# Altium PCB PCI Express Mini_3000X5095_52PIN_Full-Mini-Type F1.PCBDOC (part 6 of 8)
Units mm, origin at the board's own origin, x right, y up, seen from the top; angles counter-clockwise.
Board outline 70 x 83.2 mm, 6 copper layers (TopLayer, Layer 1, Layer 2, Layer 3, Layer 4, Bottom Layer), stack 0.914 mm thick; 380 components, 252 nets, 1258 pads, 603 vias.
Unrouted connection lines stored in the file: 10.
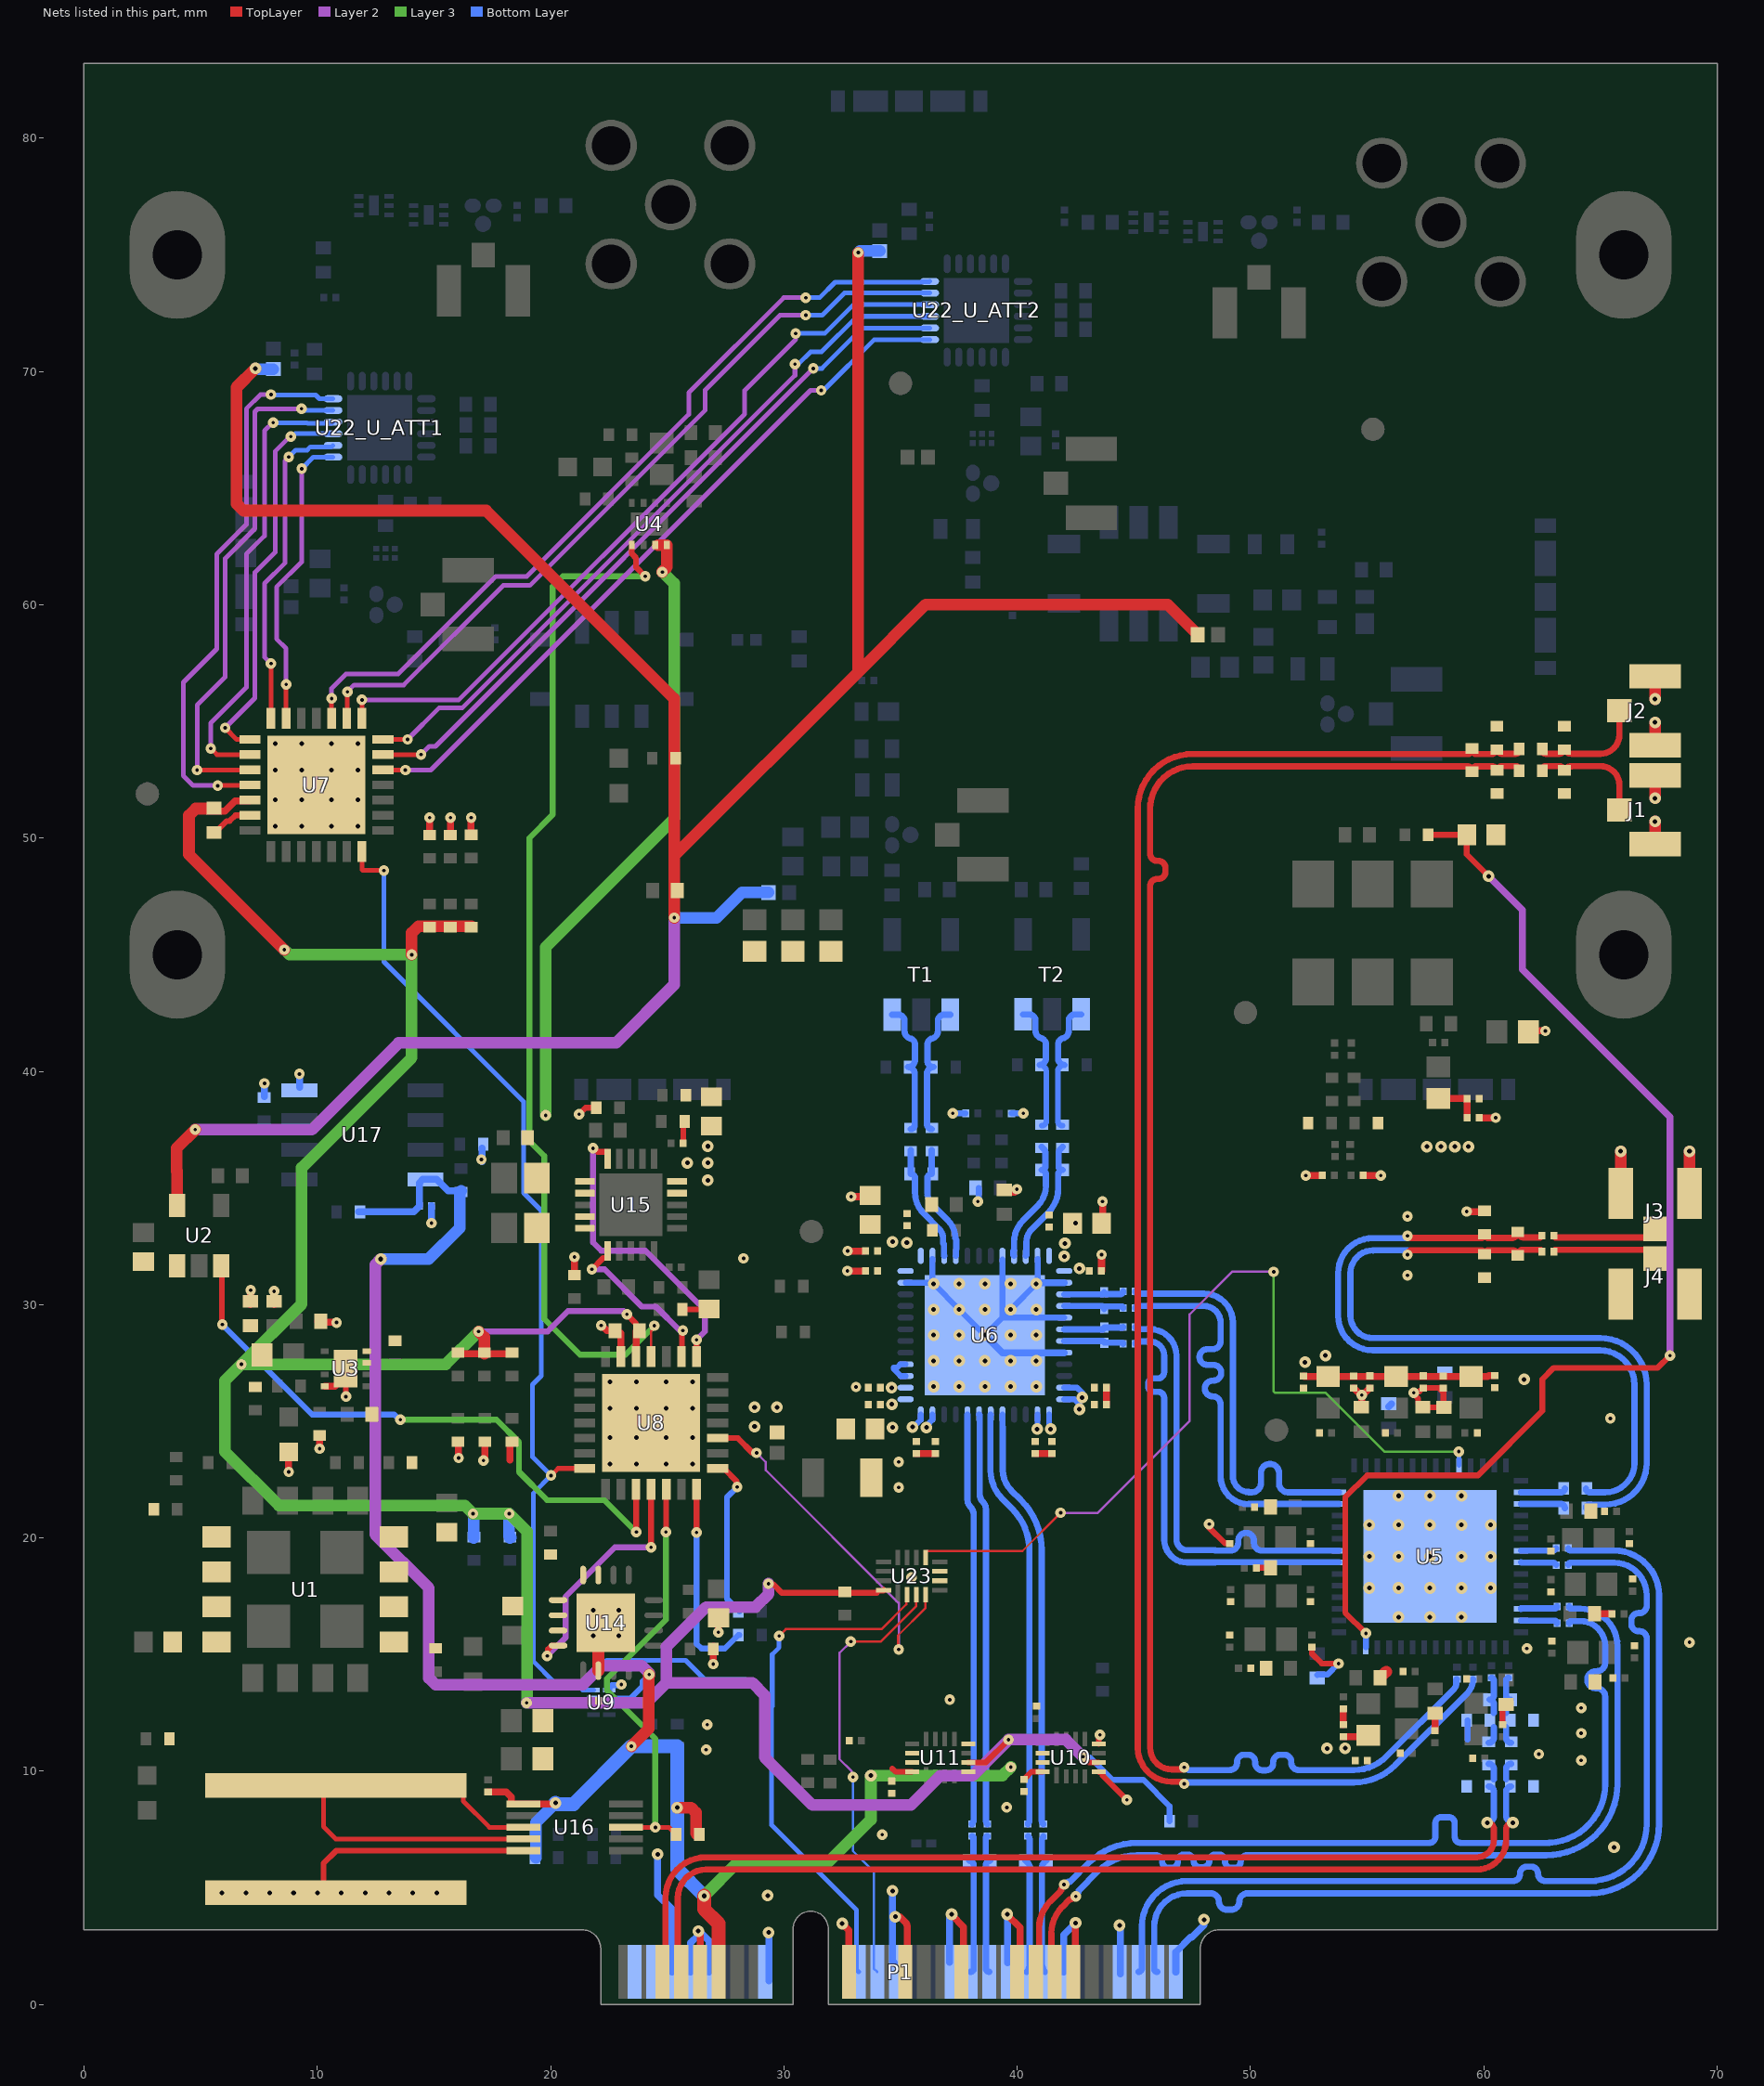
[diagram p7: the nets of this part, all layers, seen from the top]

## Via types
v1: diameter 0.45, hole 0.15, TopLayer to Bottom Layer, tented both sides, 332 vias
v2: diameter 0.5, hole 0.2, TopLayer to Bottom Layer, tented both sides, 214 vias
v3: diameter 0.5, hole 0.2, TopLayer to Bottom Layer, 32 vias
v4: diameter 0.45, hole 0.15, TopLayer to Bottom Layer, 25 vias

## Nets (pads, with @x,y where several pads share a name; then routed paths per layer and width w, separated by ;. In a path a pad name is that pad's centre, name@x,y a point inside that pad or via, vN(x,y) a via of type N, cw(c..) or ccw(c..) an arc to the next point about the centre after c; other vN are vias at no path point) (continued)
3V3_DIGIT: C9.2 C67.2 C68.2 FB1.2 R10.1 R11.1 R57.1 R58.1 R59.1 R64.1 R67.1 R68.1 R69.1 R75.1 R124.2 U7.5 U8.5 U9.7 U10.6 U11.6 U23.16 | length 140.9
  TopLayer w0.25: v1(23.269,29.581) 23.66,29.19 23.66,28.891 C67.2@23.675,28.876 ; v1(29.343,18.038) 29.381,18 29.552,18 29.906,17.646 32.61,17.646 33.983,17.646 34.077,17.739 34.252,17.739 U23.16@34.277,17.764 ; U11.6@37.9,10.379 38.663,10.379 39.631,11.347 v4(39.631,11.351) ; v1(42.826,10.62) 42.826,10.618 43.064,10.379 U10.6@43.495,10.379
  TopLayer w0.3: C68.2@5.576,51.154 6.036,51.154 6.477,51.595 7.084,51.595 U7.5@7.117,51.627 ; R69.1@16.032,27.892 17.162,27.892 R67.1@18.351,27.892 ; U8.5@23.66,27.779 23.668,27.787 23.668,28.868 C67.2@23.675,28.876
  TopLayer w0.5: C68.2@5.576,51.264 4.791,51.264 4.498,50.971 4.498,49.301 v1(8.587,45.212) ; v1(14.046,45) 14.046,45.934 14.339,46.227 R59.1@16.596,46.227 ; v1(16.916,28.848) 17.162,28.603 R68.1@17.162,27.892
  Layer 2 w0.25: v1(16.916,28.848) 19.877,28.848 20.747,29.719 23.131,29.719 v1(23.269,29.581)
  Layer 2 w0.5: v1(18.976,12.931) 24.105,12.931 24.959,13.785 ; v1(29.343,18.038) 29.343,17.603 28.779,17.039 26.667,17.039 24.959,15.331 24.959,13.785 ; v1(42.826,10.62) 42.092,11.354 39.631,11.354 38.083,9.806 36.698,9.806 35.439,8.547 31.229,8.547 29.179,10.597 29.179,13.258 28.649,13.788 28.646,13.785 24.959,13.785
  Layer 3 w0.5: v1(8.587,45.212) 8.596,45.212 8.808,45 v1(14.046,45) 14.046,40.586 9.332,35.871 9.332,30.023 v1(6.751,27.442) ; v1(16.916,28.848) 15.51,27.442 v1(6.751,27.442) ; v1(18.976,12.931) 18.987,12.941 18.987,20.28 v1(18.227,21.04) v1(16.674,21.04) 16.322,21.392 8.352,21.392 6.05,23.693 6.05,26.741 v1(6.751,27.442)
  Bottom Layer w0.25: v1(42.826,10.62) 42.864,10.582 43.123,10.582 44.08,9.624 45.41,9.624 46.532,8.502 R64.1@46.532,7.858
  Bottom Layer w0.5: v1(16.674,21.04) 16.711,21.003 R10.1@16.711,19.989 ; v1(18.227,21.04) 18.227,20.081 18.288,20.019 R11.1@18.257,19.989
3V3_MB: C14.1 C70.1 C153.2 C154.2 P1.11 R65.2 R66.2 R107.2 R110.1 R111.1 R112.2 R113.2 U9.2 U10.14 U10.15 U10.16 U11.14 U11.15 U11.16 U16.6 U17.8 | length 89
  TopLayer w0.25: 34.639,10.118 34.778,9.979 U11.16@35.5,9.979 ; C70.1@40.287,9.65 40.297,9.65 40.322,9.675 40.322,9.68 40.62,9.979 U10.16@41.095,9.979
  TopLayer w0.3: C153.2@17.323,9.107 18.102,9.107 18.316,8.893 18.316,8.594 U16.6@18.827,8.594 20.111,8.594 20.155,8.638 v2(20.209,8.638)
  TopLayer w0.5: v4(23.465,11.069) 24.204,11.809 24.204,14.069 24.224,14.09 v1(24.224,14.148) ; v2(25.429,8.437) 26.024,8.437 26.229,8.232 26.229,7.335 26.279,7.285 R107.2@26.329,7.285
  TopLayer w0.6: v2(26.579,4.655) 26.579,4.093 27.2,3.472 P1.11@27.2,1.4
  Layer 2 w0.5: v2(12.725,31.953) 12.48,31.708 12.48,20.153 14.783,17.85 14.783,13.993 15.076,13.7 21.376,13.7 22.195,14.52 23.91,14.52 24.224,14.206 v1(24.224,14.148)
  Layer 3 w0.5: v2(26.579,4.655) 27.995,6.071 31.873,6.071 33.727,7.924 v2(33.727,9.811) 39.36,9.811 v4(39.727,10.178)
  Bottom Layer w0.2: U9.2@22.514,13.131 23.428,13.131
  Bottom Layer w0.25: 23.428,13.131 23.952,13.656 23.952,13.855 24.224,14.127 v1(24.224,14.148)
  Bottom Layer w0.3: R113.2@11.777,33.977 R113.2@11.827,33.977 14.133,33.977 14.377,34.221 C154.2@14.377,34.231 14.377,35.224 14.527,35.374 U17.8@14.637,35.374 15.112,35.374 15.605,34.88 R112.2@16.161,34.88
  Bottom Layer w0.5: v2(12.725,31.953) 14.774,31.953 16.111,33.29 16.111,34.83 R112.2@16.161,34.88 ; R111.1@19.38,6.294 19.378,6.297 19.378,7.282 19.375,7.285 19.375,7.805 v2(20.209,8.638)
  Bottom Layer w0.6: v2(20.209,8.638) 20.255,8.592 20.988,8.592 v4(23.465,11.069) 25.429,11.069 R66.2@25.429,11.019 v2(25.429,8.437) 25.429,5.805 v2(26.579,4.655)
3V6_DCDC: C2.2 C6.2 C10.2 C91.2 C139.2 C140.2 R2.2 R97.2 R120.2 R123.1 U1.9 U1.10 U1.11 U1.12 U3.7 U3.8 U4.7 U4.8 U14.1 U14.2 U14.3 U14.15 U14.16 U15.1 U15.2 U15.4 U15.5 | length 27.4
  TopLayer w0.5: 24.609,62.563 U4.8@24.984,62.563 24.984,61.619 24.789,61.424 v1(24.789,61.399)
  Layer 3 w0.5: v1(19.787,38.116) 19.787,45.322 25.298,50.833 25.298,60.915 24.814,61.399 v1(24.789,61.399)
5V: C4.2 FB24.1 FB25.1 FB26.1 FB27.1 R122.2 U2.5 | length 119
  TopLayer w0.5: 3.976,35.712 3.971,35.712 3.971,36.703 v1(4.768,37.5) ; U2.5@3.988,34.258 3.988,35.724 ; v2(7.348,70.13) 6.539,69.32 6.539,64.331 6.831,64.038 17.242,64.038 25.298,55.982 25.298,53.422 25.298,49.224 ; v1(25.298,46.585) 25.298,47.761 25.298,49.224 ; v1(33.187,75.098) 33.187,57.114 ; FB27.1@47.735,58.715 46.442,60.009 36.082,60.009 33.187,57.114 ; 25.298,49.224 33.187,57.114
  Layer 2 w0.5: v1(4.768,37.5) 9.764,37.5 13.487,41.224 22.809,41.224 25.298,43.713 v1(25.298,46.585)
  Bottom Layer w0.5: v2(7.348,70.13) 7.378,70.1 FB24.1@8.118,70.1 ; v1(25.298,46.585) 27.12,46.585 28.199,47.665 FB26.1@29.341,47.665 ; v1(33.187,75.098) 33.254,75.164 FB25.1@34.108,75.164
12V: C1.2 C3.2 R1.2 R106.2 R121.2 U1.1 U1.2 U1.3 U1.4 U2.1 U16.8 U16.9 | length 19.7
  TopLayer w0.2: U16.9@18.827,7.094 10.793,7.094 10.267,7.62 10.267,8.965 10.692,9.39 15.837,9.39 16.262,8.965 16.262,8.714 17.382,7.594 U16.8@18.827,7.594
2122_0VDD: C88.2 C89.2 C90.2 C179.2 FB7.2 U6.25 U6.26 U6.35 U6.36 | length 2.7
  Bottom Layer w0.25: v2(35.509,24.753) 35.553,24.753 35.867,25.067 U6.36@35.867,25.292 ; v2(36.109,24.732) 36.157,24.78 36.157,24.857 36.367,25.067 U6.35@36.367,25.292 ; v2(40.855,24.668) 40.867,24.681 U6.26@40.867,25.292 ; U6.25@41.367,25.292 41.367,24.799 41.431,24.736 v2(41.431,24.668)
  other v4: 34.924,22.166 34.924,23.254
2122_VCC: C76.2 C77.2 C78.2 C79.2 C80.2 C81.2 C82.2 C83.2 C84.2 C85.2 C86.2 C87.2 FB6.2 R96.1 U6.1 U6.12 U6.13 U6.23 U6.24 U6.37 U6.38 U6.48 | length 2
  Bottom Layer w0.25: U6.24@42.017,25.942 42.452,25.942 42.669,25.725 v2(42.669,25.516) ; U6.23@42.017,26.442 42.561,26.442 42.786,26.218 v2(42.786,26.018)
  other v2: 34.658,24.731 28.744,24.772 28.744,25.603 29.701,25.602 34.631,25.734 34.615,26.438 42.669,31.552 42.02,32.072 42.044,32.622 35.27,32.652 34.661,32.692 42.507,33.486
4610_FINE_V: C93.2 C94.2 C97.2 C98.2 C101.2 C102.2 C105.2 C106.2 C109.2 C110.2 C129.2 C130.2 FB8.1 FB9.1 FB10.1 FB11.1 FB12.1 R100.2 R104.2 R105.2 U15.14 U15.15 | length 14
  TopLayer w0.25: v1(21.223,38.16) 21.505,38.442 R104.2@22.01,38.442 ; C130.2@25.68,36.925 25.688,36.934 25.688,37.847 R100.2@25.696,37.855
  TopLayer w0.3: R105.2@21.023,31.214 v1(21.023,32.041) ; C105.2@52.273,26.941 52.283,26.941 52.311,26.913 FB11.1@53.322,26.913 FB10.1@56.239,26.913 FB8.1@59.454,26.913 60.164,26.913 60.218,26.967 C93.2@60.462,26.967 ; C98.2@53.978,11.474 54.979,11.474 FB9.1@55.049,11.544 ; FB12.1@58.054,38.836 C110.2@59.278,38.836 C109.2@59.278,38.01
  other v2: 53.282,10.975 54.057,10.988 61.73,26.792 52.34,27.53 53.213,27.817 26.741,35.328 25.86,36.08 26.741,36.08 26.741,36.788 57.558,36.77 58.164,36.77 58.758,36.77 59.344,36.77
04610_Stat1: U5.10 U23.9 | length 37.5
  TopLayer w0.1: U23.9@36.077,19.164 36.077,19.389 36.127,19.439 40.224,19.439 v1(41.861,21.076)
  Layer 2 w0.1: v1(41.861,21.076) 43.45,21.076 47.396,25.023 47.396,29.585 49.235,31.424 50.973,31.424 v1(50.994,31.402)
  Layer 3 w0.1: v1(50.994,31.402) 50.994,26.277 51.052,26.219 53.223,26.219 55.74,23.702 v1(58.928,23.702)
  Bottom Layer w0.2: v1(58.928,23.702) 58.935,23.694 58.935,23.114 U5.10@58.943,23.106
04610_Stat1_3V3: U8.24 U23.4 | length 15.7
  TopLayer w0.1: v1(34.922,15.222) 34.892,15.252 34.892,15.816 36.06,16.984 36.06,17.548 U23.4@36.077,17.564
  TopLayer w0.25: U8.24@27.16,24.279 28.023,24.279 28.656,23.647 v1(28.829,23.647)
  Layer 2 w0.1: v1(28.829,23.647) 29.22,23.256 29.22,22.909 34.922,17.207 v1(34.922,15.222)
+12: P1.2 P1.4 R106.1 U16.10 | length 10.3
  TopLayer w0.25: R106.1@10.789,4.79 10.692,4.79 10.267,5.215 10.267,6.053 10.808,6.594 U16.10@18.827,6.594
  other v2: 5.921,4.776 6.942,4.776 7.964,4.776 8.986,4.776 10.008,4.776 11.029,4.776 12.051,4.776 13.073,4.776 14.095,4.776 15.117,4.776
Ain_2122_A_N: R47.1 R49.2 U6.4 | length 5.1
  Bottom Layer w0.268: R49.2@36.342,36.627 36.337,36.627 36.337,35.604 ccw(c36.337,35.418) 36.151,35.418 36.151,34.802 ccw(c36.891,34.802) 36.367,34.278 37.034,33.612 cw(c36.278,32.857) 37.347,32.857 37.347,32.854 cw(c37.251,32.758) 37.386,32.758 37.386,32.377 ccw(c37.41,32.353) 37.376,32.353 37.376,32.101 U6.4@37.367,32.092
AIn_2122_A_P: R45.2 R47.2 U6.3 | length 5.1
  Bottom Layer w0.268: R45.2@35.43,36.627 35.437,36.627 35.437,35.604 cw(c35.437,35.418) 35.623,35.418 35.623,34.8 ccw(c36.887,34.8) 35.993,33.906 36.658,33.241 cw(c36.271,32.854) 36.819,32.854 36.819,32.663 ccw(c36.886,32.663) 36.838,32.615 cw(c36.791,32.567) 36.858,32.567 36.858,32.101 U6.3@36.867,32.092
AIn_2122_B_N: R53.1 R56.2 U6.9 | length 5.4
  Bottom Layer w0.268: U6.9@39.867,32.092 39.839,32.12 39.839,32.291 cw(c39.887,32.291) 39.853,32.325 ccw(c39.819,32.359) 39.867,32.359 39.867,32.682 cw(c41.182,32.682) 40.252,33.612 40.875,34.235 ccw(c40.011,35.099) 41.233,35.099 41.233,35.585 ccw(c41.047,35.585) 41.047,35.771 ccw(c41.047,35.937) 41.213,35.937 41.213,36.507 ccw(c40.988,36.507) R56.2@41.147,36.666 ; R56.2@41.047,36.766 R56.2@41.147,36.666
AIn_2122_B_P: R51.2 R53.2 U6.10 | length 5.4
  Bottom Layer w0.268: U6.10@40.367,32.092 40.395,32.12 40.395,32.678 cw(c41.191,32.678) 40.628,33.241 41.326,33.939 ccw(c40.275,34.989) 41.761,34.989 41.761,35.585 cw(c41.947,35.585) 41.947,35.771 cw(c41.947,35.947) 41.771,35.947 41.771,36.403 ccw(c41.747,36.427) 41.781,36.427 41.781,36.507 cw(c42.007,36.507) 41.847,36.666 R51.2@41.947,36.766
Ain_2122A_N: R48.1 R49.1 T1.3 | length 5.9
  Bottom Layer w0.268: R48.1@36.151,40.453 ccw(c36.417,40.453) 36.417,40.186 ccw(c36.417,39.902) 36.134,39.902 36.134,37.736 ccw(c36.342,37.736) R49.1@36.342,37.527 ; 36.151,40.487 36.151,41.147 cw(c36.419,41.147) 36.351,41.406 ccw(c36.267,41.729) 36.601,41.729 36.601,42.161 cw(c36.869,42.161) 36.869,42.429 T1.3@37.137,42.429
AIn_2122A_P: R45.1 R46.2 T1.1 | length 6
  Bottom Layer w0.268: T1.1@34.637,42.429 34.905,42.429 cw(c34.905,42.161) 35.173,42.161 35.173,41.729 ccw(c35.507,41.729) 35.423,41.406 cw(c35.355,41.147) 35.623,41.147 35.623,40.487 cw(c35.322,40.487) 35.322,40.186 cw(c35.322,39.902) 35.606,39.902 35.606,37.702 cw(c35.43,37.702) R45.1@35.43,37.527
AIn_2122B_N: R55.1 R56.1 T2.1 | length 5.8
  Bottom Layer w0.234: R55.1@40.956,40.275 cw(c40.956,39.975) 41.255,39.975 41.255,37.874 cw(c41.047,37.874) R56.1@41.047,37.666
  Bottom Layer w0.267: T2.1@40.248,42.443 40.518,42.443 cw(c40.518,42.176) 40.785,42.176 40.785,41.743 ccw(c41.118,41.743) 41.032,41.421 cw(c40.962,41.163) 41.229,41.163 41.229,40.548 cw(c40.956,40.548) R55.1@40.956,40.275
AIn_2122B_P: R51.1 R52.2 T2.3 | length 5.9
  Bottom Layer w0.234: R51.1@41.947,37.666 cw(c41.947,37.874) 41.739,37.874 41.739,39.984 cw(c42.03,39.984) R52.2@42.03,40.275
  Bottom Layer w0.267: R52.2@42.03,40.275 cw(c42.03,40.548) 41.756,40.548 41.756,40.925 41.756,41.16 cw(c42.023,41.16) 41.959,41.419 ccw(c41.878,41.743) 42.212,41.743 42.212,42.176 cw(c42.479,42.176) 42.479,42.443 T2.3@42.748,42.443
Alert_curr_vol_meas: R107.1 U8.19 U16.3 | length 18.7
  TopLayer w0.2: U16.3@23.227,7.594 v1(24.491,7.594) 25.069,7.594 R107.1@25.379,7.285 R107.1@25.429,7.285
  TopLayer w0.25: v1(24.945,20.249) 24.953,20.257 24.953,22.072 U8.19@24.96,22.079
  Layer 3 w0.25: v1(24.491,7.594) 24.491,11.392 22.419,13.464 22.419,13.969 24.945,16.495 v1(24.945,20.249)
ATT_330_V1: U7.19 U22_U_ATT2.19 | length 31.1
  TopLayer w0.2: U7.19@12.817,52.927 12.831,52.913 v1(13.776,52.913)
  Layer 2 w0.2: v1(13.776,52.913) 14.863,52.913 31.14,69.19 v1(31.598,69.19)
  Bottom Layer w0.2: v1(31.598,69.19) 31.699,69.19 33.873,71.364 U22_U_ATT2.19@36.248,71.364
ATT_330_V2: U7.20 U22_U_ATT2.20 | length 31
  TopLayer w0.2: U7.20@12.817,53.577 v1(14.45,53.577)
  Layer 2 w0.2: v1(14.45,53.577) 14.8,53.927 15.062,53.927 v1(31.264,70.13)
  Bottom Layer w0.2: v1(31.264,70.13) 31.631,70.13 33.365,71.864 U22_U_ATT2.20@36.248,71.864
ATT_330_V3: U7.21 U22_U_ATT2.21 | length 31.2
  TopLayer w0.2: U7.21@12.817,54.227 v1(13.87,54.227)
  Layer 2 w0.2: v1(13.87,54.227) 15.215,55.573 16.213,55.573 30.474,69.835 v1(30.474,70.312)
  Bottom Layer w0.2: v1(30.474,70.312) 30.62,70.312 31.147,70.84 31.612,70.84 33.136,72.364 U22_U_ATT2.21@36.248,72.364
ATT_330_V4: U7.22 U22_U_ATT2.22 | length 32.9
  TopLayer w0.2: U7.22@11.917,55.127 v1(11.917,55.923)
  Layer 2 w0.2: v1(11.917,55.923) 16.068,55.923 28.316,68.171 28.316,69.184 30.504,71.372 v1(30.504,71.626)
  Bottom Layer w0.2: v1(30.504,71.626) 30.507,71.629 31.751,71.629 32.986,72.864 U22_U_ATT2.22@36.248,72.864
ATT_330_V5: U7.23 U22_U_ATT2.23 | length 33.7
  TopLayer w0.2: U7.23@11.267,55.127 11.281,55.142 11.281,56.254 v1(11.295,56.269)
  Layer 2 w0.2: v1(11.295,56.269) 11.295,56.283 11.574,56.562 13.706,56.562 17.97,60.826 19.113,60.826 26.63,68.342 26.63,69.211 29.834,72.415 v1(30.937,72.415)
  Bottom Layer w0.2: v1(30.937,72.415) 31.644,72.415 32.592,73.364 U22_U_ATT2.23@36.248,73.364
ATT_330_V6: U7.24 U22_U_ATT2.24 | length 34.7
  TopLayer w0.2: U7.24@10.617,55.127 v1(10.617,55.983)
  Layer 2 w0.2: v1(10.617,55.983) 10.617,56.417 11.235,57.035 13.466,57.035 17.651,61.221 18.982,61.221 25.923,68.163 25.923,69.09 29.997,73.164 v1(30.937,73.164)
  Bottom Layer w0.2: v1(30.937,73.164) 31.533,73.164 32.198,73.829 35.892,73.829 35.908,73.845 36.229,73.845 U22_U_ATT2.24@36.248,73.864
ATT_ILS_V1: U7.27 U22_U_ATT1.19 | length 12.9
  TopLayer w0.2: U7.27@8.667,55.127 v1(8.667,56.583)
  Layer 2 w0.2: v1(8.667,56.583) 8.667,58.125 8.255,58.537 8.255,60.76 9.333,61.838 v1(9.333,65.831)
  Bottom Layer w0.2: v1(9.333,65.831) 9.833,66.331 U22_U_ATT1.19@10.676,66.331
ATT_ILS_V2: U7.28 U22_U_ATT1.20 | length 13.9
  TopLayer w0.2: U7.28@8.017,55.127 v1(8.017,57.48)
  Layer 2 w0.2: v1(8.017,57.48) 7.739,57.758 7.739,60.91 8.611,61.782 8.611,66.166 v1(8.776,66.331)
  Bottom Layer w0.2: v1(8.776,66.331) 9.069,66.623 9.564,66.623 9.707,66.767 10.611,66.767 U22_U_ATT1.20@10.676,66.831
ATT_ILS_V3: U7.1 U22_U_ATT1.21 | length 16.8
  TopLayer w0.2: v1(6.05,54.722) 6.544,54.227 U7.1@7.117,54.227
  Layer 2 w0.2: v1(6.05,54.722) 7.329,56 7.329,61.384 8.191,62.247 8.191,66.574 8.826,67.208 v1(8.865,67.208)
  Bottom Layer w0.2: v1(8.865,67.208) 8.932,67.208 9.055,67.331 U22_U_ATT1.21@10.676,67.331
ATT_ILS_V4: U7.2 U22_U_ATT1.22 | length 19.5
  TopLayer w0.2: v1(5.434,53.842) 5.699,53.577 U7.2@7.117,53.577
  Layer 2 w0.2: v1(5.434,53.842) 5.434,54.933 6.96,56.459 6.96,62.173 7.739,62.952 7.739,67.458 8.087,67.806 v1(8.112,67.806)
  Bottom Layer w0.2: v1(8.112,67.806) 9.551,67.806 9.585,67.772 10.617,67.772 U22_U_ATT1.22@10.676,67.831
ATT_ILS_V5: U7.3 U22_U_ATT1.23 | length 22.1
  TopLayer w0.2: v1(4.844,52.913) 7.102,52.913 U7.3@7.117,52.927
  Layer 2 w0.2: v1(4.844,52.913) 4.849,52.918 4.849,55.697 6.05,56.898 6.05,61.981 7.329,63.259 7.329,68.275 7.446,68.392 9.311,68.392 v1(9.322,68.402)
  Bottom Layer w0.2: v1(9.322,68.402) 9.393,68.331 U22_U_ATT1.23@10.676,68.331
ATT_ILS_V6: U7.4 U22_U_ATT1.24 | length 23.9
  TopLayer w0.2: v1(5.735,52.242) 5.753,52.26 7.099,52.26 U7.4@7.117,52.277
  Layer 2 w0.2: v1(5.735,52.242) 5.717,52.26 4.669,52.26 4.259,52.67 4.259,56.675 5.69,58.106 5.69,62.173 6.96,63.443 6.96,68.401 7.57,69.011 v1(8.017,69.011)
  Bottom Layer w0.2: v1(8.017,69.011) 8.041,68.987 9.933,68.987 10.088,68.831 U22_U_ATT1.24@10.676,68.831
CLK_SYNC: P1.20 U23.3 | length 18.9
  TopLayer w0.1: v1(32.868,15.554) 34.147,15.554 35.659,17.066 35.659,17.546 U23.3@35.677,17.564
  Layer 2 w0.1: v1(32.868,15.554) 32.386,15.072 32.386,10.522 32.893,10.015 32.893,9.818 v1(32.96,9.751)
  Bottom Layer w0.1: v1(32.96,9.751) 32.96,6.585 33.854,5.691 33.854,1.546 P1.20@34,1.4
CLKin0_N: J1.2 R24.1 R25.2 | length 5.2
  TopLayer w0.267: R24.1@62.459,52.882 cw(c62.664,52.882) 62.664,53.087 63.22,53.087 cw(c63.22,52.855) 63.451,52.855 cw(c63.572,52.855) 63.487,52.94 63.567,53.021 cw(c63.69,52.898) 63.69,53.071 63.762,53.071 cw(c63.792,53.041) 63.792,53.084 64.99,53.084 cw(c64.99,52.259) 65.815,52.259 J1.2@65.815,51.208
CLKin0_P: J2.2 R28.1 R30.1 | length 5.2
  TopLayer w0.267: R30.1@62.459,53.819 ccw(c62.664,53.819) 62.664,53.614 63.228,53.614 ccw(c63.228,53.84) 63.454,53.84 ccw(c63.575,53.84) 63.489,53.755 63.569,53.674 ccw(c63.692,53.797) 63.692,53.624 63.764,53.624 ccw(c63.795,53.654) 63.795,53.611 64.99,53.611 ccw(c64.99,54.436) 65.815,54.436 J2.2@65.815,55.46
CLKin0P_N: C46.2 R24.2 R26.2 R27.2 | length 75.6
  TopLayer w0.267: v1(47.157,10.171) cw(c47.065,10.171) 47.065,10.079 46.622,10.079 cw(c46.622,11.005) 45.696,11.005 45.696,47.029 45.696,47.938 cw(c46.006,47.938) 46.006,48.248 46.045,48.248 ccw(c46.045,48.558) 46.355,48.558 46.355,48.713 ccw(c46.045,48.713) 46.045,49.023 46.006,49.023 cw(c46.006,49.333) 45.696,49.333 45.696,50.258 45.696,51.255 cw(c47.517,51.255) 47.517,53.075 59.303,53.075 cw(c59.303,52.889) 59.49,52.889 cw(c59.676,52.889) 59.676,53.075 60.349,53.075 cw(c60.349,52.855) 60.569,52.855 cw(c60.801,52.855) 60.801,53.087 61.354,53.087 cw(c61.354,52.882) R24.2@61.559,52.882
  Bottom Layer w0.267: v1(47.157,10.171) ccw(c47.379,10.319) 47.379,10.052 48.006,10.052 48.607,10.052 48.98,10.052 ccw(c49.053,11.027) 49.053,10.049 49.114,10.049 ccw(c49.114,10.359) 49.424,10.359 49.424,10.399 cw(c49.734,10.399) 49.734,10.709 49.889,10.709 cw(c49.889,10.399) 50.199,10.399 50.199,10.349 ccw(c50.509,10.349) 50.509,10.039 50.664,10.039 ccw(c50.664,10.349) 50.974,10.349 50.974,10.399 cw(c51.284,10.399) 51.284,10.709 51.439,10.709 cw(c51.439,10.399) 51.749,10.399 51.749,10.359 ccw(c52.059,10.359) 52.059,10.049 53.223,10.049 54.43,10.049 ccw(c54.43,12.021) 55.824,10.627 58.713,13.515 ccw(c58.452,13.776) 58.821,13.776 58.821,13.905 cw(c58.877,13.905) 58.837,13.945 C46.2@58.847,13.945
CLKin0P_P: C47.2 R27.1 R29.1 R30.2 | length 75.8
  TopLayer w0.267: v1(47.157,9.461) ccw(c47.065,9.461) 47.065,9.552 46.622,9.552 cw(c46.622,11.005) 45.169,11.005 45.169,51.255 cw(c47.517,51.255) 47.517,53.602 59.303,53.602 ccw(c59.303,53.789) 59.49,53.789 ccw(c59.676,53.789) 59.676,53.602 60.318,53.602 ccw(c60.318,53.84) 60.556,53.84 ccw(c60.783,53.84) 60.783,53.614 61.354,53.614 ccw(c61.354,53.819) R30.2@61.559,53.819
  Bottom Layer w0.267: v1(47.157,9.461) cw(c47.219,9.461) 47.219,9.522 54.432,9.522 ccw(c54.432,12.017) 56.196,10.253 59.29,13.347 ccw(c58.693,13.945) C47.2@59.538,13.945
CLKin1_N: P1.5 R37.1 R39.1 | length 43.7
  TopLayer w0.267: P1.5@24.8,1.4 ccw(c24.8,1.526) 24.926,1.526 24.926,4.569 cw(c26.668,4.569) 26.668,6.311 59.69,6.311 ccw(c59.69,7.052) 60.431,7.052 60.431,7.511 ccw(c60.145,7.511) v2(60.145,7.798)
  Bottom Layer w0.267: v2(60.145,7.798) ccw(c60.145,8.084) 60.431,8.084 60.431,9.125 ccw(c60.21,9.125) R37.1@60.21,9.347 ; R39.1@60.21,10.316 cw(c60.21,10.096) 60.429,10.096 60.429,9.647
CLKin1_P: P1.7 R31.1 R32.2 | length 43.7
  TopLayer w0.267: P1.7@25.6,1.4 cw(c25.6,1.547) 25.453,1.547 25.453,4.569 cw(c26.668,4.569) 26.668,5.784 59.69,5.784 ccw(c59.69,7.052) 60.958,7.052 60.958,7.511 cw(c61.245,7.511) v2(61.245,7.798)
  Bottom Layer w0.267: 60.956,9.647 60.956,10.096 cw(c61.176,10.096) R31.1@61.176,10.316 ; R32.2@61.18,9.347 ccw(c61.18,9.125) 60.958,9.125 60.958,8.084 ccw(c61.245,8.084) v2(61.245,7.798)
CLKin1P_N: C59.2 R34.1 R38.1 R39.2 | length 2.6
  Bottom Layer w0.267: R39.2@60.21,11.216 ccw(c60.21,11.435) 60.429,11.435 60.429,11.889 ; C59.2@60.323,13.999 cw(c60.323,13.893) 60.429,13.893 60.429,13.253 cw(c60.243,13.253) 60.243,13.066 cw(c60.243,12.88) 60.429,12.88 60.429,12.489
CLKin1P_P: C54.2 R31.2 R33.2 R34.2 | length 2.6
  Bottom Layer w0.267: 60.956,11.889 60.956,11.435 ccw(c61.176,11.435) R31.2@61.176,11.216 ; 60.956,12.489 60.956,12.88 cw(c61.143,12.88) 61.143,13.066 cw(c61.143,13.253) 60.956,13.253 60.956,13.893 cw(c61.063,13.893) C54.2@61.063,13.999
CLKout1_C2_N: C58.1 J4.2 | length 4.6
  TopLayer w0.267: C58.1@63.004,32.272 cw(c63.079,32.272) 63.079,32.348 66.97,32.348 cw(c66.97,31.978) J4.2@67.34,31.978
CLKout1_C2_P: C57.1 J3.2 | length 4.6
  TopLayer w0.267: C57.1@63.007,32.964 ccw(c63.095,32.964) 63.095,32.875 66.97,32.875 ccw(c66.97,33.245) J3.2@67.34,33.245
CLKout1_C_N: C58.2 R36.2 R41.2 R42.2 | length 32.8
  TopLayer w0.267: R42.2@60.003,32.194 cw(c59.921,32.112) 60.037,32.112 cw(c60.093,32.112) R42.2@60.093,32.168
  TopLayer w0.268: v1(56.728,32.144) cw(c56.91,32.144) 56.91,32.326 59.873,32.326 cw(c59.873,32.162) R42.2@60.037,32.162 cw(c60.201,32.162) 60.201,32.326 61.247,32.326 cw(c61.247,32.118) R41.2@61.455,32.118 cw(c61.691,32.118) 61.691,32.354 62.402,32.354 cw(c62.402,32.272) C58.2@62.484,32.272
  Bottom Layer w0.267: 55.255,32.326 v1@56.728,32.326 ; 55.255,32.327 ccw(c55.255,31.354) 54.282,31.354 54.282,29.529 ccw(c55.244,29.529) 55.244,28.567 64.984,28.567 cw(c64.984,26.567) 66.984,26.567 66.984,23.209 cw(c65.204,23.209) 65.204,21.429 64.529,21.429 ccw(c64.529,21.274) R36.2@64.374,21.274
CLKout1_C_P: C57.2 R35.2 R40.2 R41.1 | length 32.7
  TopLayer w0.267: R40.2@60.003,32.986 ccw(c59.921,33.068) R40.2@60.037,33.067
  TopLayer w0.268: v1(56.728,32.945) ccw(c56.818,32.945) 56.818,32.854 59.873,32.854 ccw(c59.873,33.018) R40.2@60.037,33.018 ccw(c60.201,33.018) 60.201,32.854 61.191,32.854 ccw(c61.191,33.118) R41.1@61.455,33.118 ccw(c61.691,33.118) 61.691,32.882 62.405,32.882 ccw(c62.405,32.964) C57.2@62.487,32.964
  Bottom Layer w0.267: v1@56.728,32.854 55.255,32.854 ccw(c55.255,31.354) 53.755,31.354 53.755,29.529 ccw(c55.244,29.529) 55.244,28.04 64.984,28.04 cw(c64.984,26.567) 66.457,26.567 66.457,23.209 cw(c65.204,23.209) 65.204,21.956 64.541,21.956 cw(c64.541,22.124) R35.2@64.374,22.124
CLKout1_N: R36.1 U5.17 | length 2
  Bottom Layer w0.267: U5.17@61.593,21.456 63.291,21.456 cw(c63.291,21.274) R36.1@63.474,21.274
CLKout1_P: R35.1 U5.16 | length 2
  Bottom Layer w0.267: U5.16@61.593,21.956 63.306,21.956 ccw(c63.306,22.124) R35.1@63.474,22.124
CLKout3_C_N: C51.1 P1.48 | length 41.7
  Bottom Layer w0.267: P1.48@45.2,1.4 ccw(c45.2,1.545) 45.345,1.545 45.345,3.353 cw(c47.284,3.353) 47.284,5.292 61.109,5.292 61.242,5.292 ccw(c61.242,5.602) 61.552,5.602 cw(c61.862,5.602) 61.862,5.912 62.017,5.912 cw(c62.017,5.602) 62.327,5.602 ccw(c62.637,5.602) 62.637,5.292 64.541,5.292 ccw(c64.541,7.734) 66.984,7.734 66.984,15.561 66.984,15.695 ccw(c66.674,15.695) 66.674,16.005 66.635,16.005 cw(c66.635,16.315) 66.325,16.315 66.325,16.47 cw(c66.635,16.47) 66.635,16.78 66.674,16.78 ccw(c66.674,17.09) 66.984,17.09 66.984,17.533 ccw(c65.581,17.533) 65.581,18.936 63.72,18.936 ccw(c63.72,18.839) C51.1@63.624,18.839
CLKout3_C_P: C50.1 P1.50 | length 41.8
  Bottom Layer w0.267: P1.50@46,1.4 cw(c46,1.528) 45.872,1.528 45.872,3.353 cw(c47.284,3.353) 47.284,4.765 48.295,4.765 cw(c48.295,4.414) 48.645,4.414 ccw(c48.996,4.414) 48.996,4.064 49.171,4.064 ccw(c49.171,4.414) 49.522,4.414 cw(c49.872,4.414) 49.872,4.765 55.063,4.765 64.541,4.765 ccw(c64.541,7.734) 67.511,7.734 67.511,17.533 ccw(c65.581,17.533) 65.581,19.463 63.72,19.463 cw(c63.72,19.559) C50.1@63.624,19.559
CLKout3_N: C51.2 U5.22 | length 1.6
  Bottom Layer w0.267: U5.22@61.593,18.956 61.613,18.936 62.436,18.936 62.439,18.939 62.95,18.939 cw(c62.95,18.786) 63.059,18.895 63.104,18.849 C51.2@63.104,18.839
CLKout3_P: C50.2 U5.21 | length 1.6
  Bottom Layer w0.267: U5.21@61.593,19.456 62.22,19.456 62.224,19.46 62.95,19.46 ccw(c62.95,19.613) 63.059,19.504 63.104,19.549 C50.2@63.104,19.559
CLKout5_C_N: C192.1 P1.39 | length 40.2
  TopLayer w0.267: P1.39@41.6,1.4 cw(c41.93,1.73) 41.464,1.73 41.464,3.047 cw(c43.084,3.047) 41.938,4.193 42.231,4.486 ; 42.231,4.486 cw(c42.299,4.418) 42.299,4.514 ccw(c42.299,4.611) 42.367,4.542 v1@42.427,4.603 ; v1@42.428,4.603 cw(c42.512,4.518) v1(42.512,4.638)
  Bottom Layer w0.267: v1(42.512,4.638) 42.512,4.687 42.635,4.811 42.635,4.891 43.441,5.696 cw(c45.138,3.998) 45.138,6.399 45.945,6.399 cw(c45.945,6.129) 46.214,6.129 ccw(c46.484,6.129) 46.484,5.86 46.618,5.86 ccw(c46.618,6.129) 46.888,6.129 46.888,6.159 cw(c47.157,6.159) 47.157,6.429 47.292,6.429 cw(c47.292,6.159) 47.561,6.159 ccw(c47.83,6.159) 47.83,5.89 47.965,5.89 ccw(c47.965,6.159) 48.234,6.159 cw(c48.504,6.159) 48.504,6.429 48.638,6.429 cw(c48.638,6.159) 48.908,6.159 48.908,6.129 ccw(c49.177,6.129) 49.177,5.86 49.312,5.86 ccw(c49.312,6.129) 49.581,6.129 cw(c49.851,6.129) 49.851,6.399 52.088,6.399 62.664,6.399 ccw(c62.664,9.466) 65.731,9.466 65.731,15.361 ccw(c64.126,15.361) 64.126,16.966 63.756,16.966 cw(c63.756,17.065) C192.1@63.658,17.065
CLKout5_C_P: C193.1 P1.37 | length 40.1
  TopLayer w0.267: P1.37@40.8,1.4 ccw(c40.47,1.73) 40.937,1.73 40.937,3.156 ; 40.937,3.266 cw(c42.557,3.266) 41.411,4.412 41.858,4.859 ; 41.858,4.859 ccw(c41.79,4.927) 41.887,4.927 cw(c41.983,4.927) 41.915,4.995 41.975,5.055 ccw(c41.89,5.14) v1(42.01,5.14)
  Bottom Layer w0.267: v1(42.01,5.14) 42.059,5.14 42.183,5.263 42.263,5.263 43.069,6.07 cw(c45.136,4.002) 45.136,6.926 57.524,6.926 57.658,6.926 ccw(c57.658,7.193) 57.925,7.193 57.925,7.782 cw(c58.173,7.782) 58.173,8.03 58.503,8.03 cw(c58.503,7.782) 58.751,7.782 58.751,7.193 ccw(c59.018,7.193) 59.018,6.926 62.664,6.926 62.678,6.926 ccw(c62.664,9.466) 62.812,6.93 ccw(c62.664,9.466) 65.204,9.466 65.204,13.066 65.204,13.2 ccw(c64.842,13.2) 64.842,13.562 64.796,13.562 cw(c64.796,13.924) 64.796,14.286 64.842,14.286 ccw(c64.842,14.648) 65.204,14.648 65.204,15.361 ccw(c64.126,15.361) 64.126,16.439 63.756,16.439 ccw(c63.756,16.341) C193.1@63.658,16.341
CLKout5_N: C193.2 U5.27 | length 1.6
  Bottom Layer w0.267: U5.27@61.593,16.456 63.022,16.456 cw(c63.022,16.341) C193.2@63.138,16.341
CLKout5_P: C192.2 U5.26 | length 1.6
  Bottom Layer w0.267: U5.26@61.593,16.956 61.593,16.983 63.056,16.983 ccw(c63.056,17.065) C192.2@63.138,17.065
CLKout8_C_N: C53.1 R43.2 U6.18 | length 2.6
  Bottom Layer w0.268: U6.18@42.017,28.942 43.658,28.942 ccw(c43.658,29.017) R43.2@43.733,29.017 44.518,29.017 ccw(c44.518,29.046) C53.1@44.546,29.046
CLKout8_C_P: C52.1 R43.1 U6.19 | length 2.6
  Bottom Layer w0.268: U6.19@42.017,28.442 43.658,28.442 cw(c43.658,28.367) R43.1@43.733,28.367 44.504,28.367 cw(c44.504,28.326) C52.1@44.546,28.326
CLKout8_N: C53.2 U5.50 | length 18.5
  Bottom Layer w0.268: C53.2@45.066,29.046 ccw(c45.162,29.046) 45.162,28.95 45.694,28.95 cw(c45.694,27.815) 46.828,27.815 46.828,19.932 ccw(c47.286,19.932) 47.286,19.474 48.482,19.474 ccw(c48.5,19.474) 48.5,19.456 49.001,19.456 49.135,19.456 ccw(c49.135,19.793) 49.473,19.793 49.473,19.882 cw(c49.81,19.882) 50.147,19.882 50.147,19.793 ccw(c50.484,19.793) 50.484,19.456 51.948,19.456 U5.50@53.793,19.456
CLKout8_P: C52.2 U5.49 | length 18.5
  Bottom Layer w0.268: C52.2@45.066,28.326 cw(c45.162,28.326) 45.162,28.422 45.694,28.422 cw(c45.694,27.815) 46.3,27.815 46.3,27.108 cw(c46.032,27.108) 46.032,26.84 45.827,26.84 ccw(c45.827,26.64) 45.627,26.64 45.627,26.468 ccw(c45.827,26.468) 45.827,26.268 46.032,26.268 cw(c46.032,26) 46.3,26 46.3,25.365 46.3,19.932 ccw(c47.286,19.932) 47.286,18.946 48.482,18.946 48.482,18.956 U5.49@53.793,18.956
CLKout10_C_N: C56.1 R44.2 U6.16 | length 2.7
  Bottom Layer w0.268: U6.16@42.017,29.942 43.604,29.942 cw(c43.604,29.817) R44.2@43.729,29.817 cw(c43.837,29.817) 43.837,29.926 44.467,29.926 cw(c44.467,29.847) C56.1@44.546,29.847
CLKout10_C_P: C55.1 R44.1 U6.15 | length 2.7
  Bottom Layer w0.268: U6.15@42.017,30.442 43.634,30.442 ccw(c43.634,30.537) R44.1@43.729,30.537 ccw(c43.812,30.537) 43.812,30.454 44.433,30.454 ccw(c44.433,30.567) C55.1@44.546,30.567
CLKout10_N: C56.2 U5.54 | length 18.5
  Bottom Layer w0.268: C56.2@45.066,29.847 cw(c45.162,29.847) 45.162,29.943 48.01,29.943 cw(c48.01,29.237) 48.716,29.237 48.716,28.429 cw(c48.378,28.429) 48.378,28.092 48.151,28.092 ccw(c48.151,27.755) 48.151,27.417 48.408,27.417 cw(c48.408,27.08) 48.408,26.743 48.378,26.743 ccw(c48.378,26.406) 48.378,26.069 cw(c48.378,25.731) 48.716,25.731 48.716,24.381 48.716,22.651 ccw(c49.923,22.651) 49.923,21.443 49.923,21.456 U5.54@53.793,21.456
CLKout10_P: C55.2 U5.55 | length 18.2
  Bottom Layer w0.268: C55.2@45.066,30.567 ccw(c45.162,30.567) 45.162,30.471 48.01,30.471 cw(c48.01,29.237) 49.244,29.237 49.244,22.651 ccw(c49.923,22.651) 49.923,21.971 49.923,21.956 ; 49.924,21.956 50.058,21.956 ccw(c50.058,22.344) 50.446,22.344 50.446,22.786 cw(c50.834,22.786) 51.222,22.786 51.222,22.344 ccw(c51.61,22.344) 51.61,21.956 53.789,21.956 U5.55@53.793,21.956
CMLOUT_A_N: C64.2 P1.32 R82.1 | length 6.1
  Bottom Layer w0.267: C64.2@38.727,7.214 ccw(c38.727,7.141) 38.654,7.141 38.654,6.35 ccw(c38.84,6.35) 38.84,6.163 ccw(c38.84,5.986) 38.664,5.986 38.664,1.536 ccw(c38.8,1.536) P1.32@38.8,1.4
CMLOUT_A_P: C63.2 P1.30 R82.2 | length 6.1
  Bottom Layer w0.267: P1.30@38,1.4 ccw(c38,1.537) 38.137,1.537 38.137,5.967 ccw(c37.94,5.967) 37.94,6.163 ccw(c37.94,6.35) 38.127,6.35 38.127,7.153 ccw(c38.066,7.153) C63.2@38.066,7.214
CMLOUT_AC_N: C64.1 U6.31 | length 17.7
  Bottom Layer w0.269: U6.31@38.367,25.292 38.396,25.263 38.396,21.867 ccw(c38.848,21.867) 38.529,21.547 cw(c38.209,21.227) 38.661,21.227 38.661,7.892 ccw(c38.885,7.892) C64.1@38.727,7.734
CMLOUT_AC_P: C63.1 U6.32 | length 17.6
  Bottom Layer w0.269: U6.32@37.867,25.292 37.867,21.648 ccw(c38.319,21.648) 38,21.328 cw(c37.68,21.008) 38.132,21.008 38.132,7.892 cw(c38.007,7.892) 38.095,7.804 ccw(c38.165,7.734) C63.1@38.066,7.734
CMLOUT_B_N: C61.2 P1.38 R81.1 | length 6
  Bottom Layer w0.267: C61.2@41.12,7.214 cw(c41.018,7.213) 41.09,7.141 ccw(c41.162,7.069) 41.061,7.069 41.061,6.447 ccw(c41.345,6.447) 41.144,6.246 41.213,6.177 ccw(c41.247,6.211) 41.247,6.163 ccw(c41.247,6.115) 41.213,6.149 41.144,6.08 ccw(c41.345,5.879) 41.061,5.879 41.061,4.637 41.063,4.634 41.063,1.73 ccw(c41.53,1.73) P1.38@41.2,1.4
CMLOUT_B_P: C60.2 P1.36 R81.2 | length 6
  Bottom Layer w0.267: P1.36@40.4,1.4 ccw(c40.07,1.73) 40.537,1.73 40.537,4.415 40.534,4.418 40.534,5.879 ccw(c40.249,5.879) 40.45,6.08 40.381,6.149 ccw(c40.347,6.115) 40.347,6.163 ccw(c40.347,6.211) 40.381,6.177 40.45,6.246 ccw(c40.249,6.447) 40.534,6.447 40.534,7.06 ccw(c40.316,7.06) 40.47,7.214 C60.2@40.46,7.214
CMLOUT_BC_N: C61.1 U6.29 | length 18.1
  Bottom Layer w0.269: U6.29@39.367,25.292 39.367,24.763 39.382,24.763 39.382,22.912 ccw(c40.613,22.912) 39.742,22.041 40.155,21.629 cw(c37.99,19.464) 41.051,19.464 41.051,7.901 ccw(c41.287,7.901) C61.1@41.12,7.734
CMLOUT_BC_P: C60.1 U6.30 | length 18.1
  Bottom Layer w0.269: U6.30@38.867,25.292 38.853,25.292 38.853,22.909 ccw(c40.607,22.909) 39.366,21.669 39.778,21.257 cw(c37.982,19.461) 40.522,19.461 40.522,7.879 cw(c40.422,7.879) 40.493,7.808 40.489,7.804 ccw(c40.559,7.734) C60.1@40.46,7.734
CTRL_VCXO: C38.1 R20.1 U5.41 | length 51.7
  TopLayer w0.25: v1(54.947,15.911) 54.06,16.799 54.06,21.746 54.999,22.685 59.752,22.685 62.509,25.443 62.509,26.803 62.996,27.29 67.454,27.29 v1(67.979,27.815) ; R20.1@57.569,50.14 C38.1@59.269,50.14 59.269,49.298 v2(60.202,48.364)
  Layer 2 w0.3: v2(60.202,48.364) 61.646,46.921 61.646,44.374 67.979,38.041 v1(67.979,27.815)
  Bottom Layer w0.25: U5.41@54.943,15.306 54.945,15.309 54.945,15.909 v1(54.947,15.911)
EN_2V8: U4.5 U8.4 | length 45.1
  TopLayer w0.1: U8.4@24.31,27.779 24.31,28.86 24.45,29 v1@24.45,29.041
  TopLayer w0.25: U4.5@23.484,62.563 23.484,62.186 23.661,62.009 23.661,61.615 v1(24.055,61.221) ; v1@24.45,29.041 v1(24.45,29.095)
  Layer 3 w0.25: v1@24.084,61.249 v1(24.055,61.221) 20.53,61.221 20.091,60.782 20.091,51.003 19.093,50.005 19.093,37.011 19.726,36.378 19.726,29.388 21.258,27.856 23.212,27.856 v1(24.45,29.095)
EN_5V: U2.3 U8.17 | length 26.5
  TopLayer w0.25: U2.3@5.888,31.658 5.908,31.638 5.908,29.166 v1(5.928,29.146) ; U8.17@23.66,22.079 23.668,22.072 23.668,20.257 v1(23.675,20.249)
  Layer 3 w0.25: v1@13.564,25.064 v1(13.564,25.067) 17.681,25.067 18.645,24.104 18.645,22.829 19.854,21.62 22.305,21.62 v1(23.675,20.249)
  Bottom Layer w0.25: v1(5.928,29.146) 9.782,25.292 13.298,25.292 13.523,25.067 v1(13.564,25.067)
EN_I2C_TRANSLATOR: P1.18 U7.14 U8.14 U9.8 U23.2 | length 76
  TopLayer w0.1: v1(29.794,15.799) 30.084,16.089 34.18,16.089 35.24,17.149 35.24,17.528 U23.2@35.277,17.564
  TopLayer w0.2: U7.14@11.925,49.392 11.925,48.643 11.942,48.626 12.835,48.626 v1(12.854,48.606) ; v1(20.022,22.676) 20.326,22.979 U8.14@21.46,22.979
  Bottom Layer w0.2: v1(12.854,48.606) 12.854,44.697 18.849,38.702 18.849,34.785 19.603,34.031 19.603,26.95 19.227,26.574 19.227,23.472 v1(20.022,22.676) 19.27,21.923 19.27,14.699 20.133,13.836 21.027,13.836 ; U9.8@21.844,13.481 21.381,13.481 21.027,13.836 ; v1(29.794,15.799) 29.794,15.3 29.5,15.006 29.5,12.781 ; P1.18@33.2,1.4 33.112,1.488 33.112,4.056 29.471,7.697 29.471,12.753 29.5,12.781 ; 21.027,13.836 21.49,13.836 22.41,14.756 25.787,14.756 26.607,13.935 28.346,13.935 29.5,12.781
EN_LMK_1V8: U8.2 U15.6 | length 7.3
  TopLayer w0.25: v1(21.766,31.517) 21.773,31.517 22.26,32.004 22.43,32.004 22.445,32.019 U15.6@22.445,32.304 ; U8.2@25.61,27.779 25.629,27.798 25.629,28.829 25.67,28.87 v1(25.67,28.887)
  Layer 2 w0.25: v1(21.766,31.517) 22.313,31.517 23.914,29.915 24.515,29.915 25.544,28.887 v1(25.67,28.887)
EN_LMK_3V3: U8.1 U15.20 | length 13.1
  TopLayer w0.25: v1(21.823,36.703) 21.864,36.703 22.013,36.554 22.43,36.554 22.445,36.539 U15.20@22.445,36.254 ; U8.1@26.26,27.779 v1@26.26,28.491
  Layer 2 w0.25: v1(21.823,36.703) 21.823,32.662 22.17,32.315 24.069,32.315 26.617,29.768 26.617,28.848 v1@26.26,28.491
  other v1: 26.259,28.491
EN_LMK_SPI: R87.2 U8.22 | length 7
  TopLayer w0.25: U8.22@27.16,22.979 27.425,22.979 27.971,22.433 27.971,22.211 v1(28,22.183)
  Bottom Layer w0.25: v1(28,22.183) 27.559,21.742 27.559,17.393 R87.2@28.1,16.852
EN_LTC_SPI: R13.2 U8.21 | length 8.8
  TopLayer w0.25: v1(26.26,20.233) U8.21@26.26,22.079
  Bottom Layer w0.25: v1(26.26,20.233) 26.26,15.466 26.469,15.257 27.471,15.257 R13.2@28.05,15.836 R13.2@28.1,15.836
EN_POWER_LTC2122: U8.18 U14.4 | length 10.7
  TopLayer w0.25: v1(19.855,14.942) 19.883,14.97 19.883,15.219 20.048,15.384 U14.4@20.323,15.384 ; v1(24.31,19.594) U8.18@24.31,22.079
  Layer 2 w0.25: v1(19.855,14.942) 20.641,15.728 20.641,17.48 22.754,19.594 v1(24.31,19.594)
GND: C7.1 C8.1 C9.1 C14.2 C15.2 C35.1 C36.1 C37.1 C38.2 C39.2 C45.1 C62.1 C65.1 C66.1 C67.1 C68.1 C70.2 C71.2 C73.1 C74.1 C75.1 C76.1 C77.1 C78.1 C79.1 C80.1 C81.1 C82.1 C83.1 C84.1 C85.1 C86.1 C87.1 C88.1 C89.1 C90.1 C92.2 C93.1 C94.1 C95.1 C96.1 C97.1 C98.1 C99.1 C100.1 C101.1 C102.1 C103.1 C104.1 C105.1 C106.1 C107.1 C108.1 C109.1 C110.1 C113.1 C114.1 C115.1 C116.1 C117.1 C118.1 C119.1 C120.1 C121.1 C122.1 C123.1 C124.1 C125.1 C126.1 C127.1 C128.1 C129.1 C131.1 C132.1 C133.1 C134.1 C135.1 C136.1 C137.1 C138.1 C141.1 C143.1 C144.1 C145.1 C146.1 C147.1 C148.1 C149.1 C150.1 C154.1 C179.1 D12.2 FB15.2 FB30.2 FB31.2 FB32.1 FB33.1 FB34.1 J1.1 J1.3 J2.1 J2.3 J3.1 J3.3 J4.1 J4.3 P1.6 P1.8 P1.9 P1.10 P1.16 P1.17 P1.22 P1.23 P1.28 P1.29 P1.34 P1.35 P1.40 P1.41 P1.46 P1.52 R7.1 R19.2 R23.1 R25.1 R26.1 R28.2 R29.2 R32.1 R33.1 R37.2 R38.2 R40.1 R42.1 R60.1 R61.1 R62.1 R72.1 R73.1 R74.1 R99.1 R101.1 R103.2 R114.1 R115.1 U3.4 U3.9 U5.57 U6.2 U6.8 U6.11 U6.14 U6.17 U6.20 U6.39 U6.40 U6.47 U6.49 U7.6 U7.29 U8.6 U8.29 U9.1 U10.5 U10.8 U11.5 U11.8 U14.6 U14.17 U17.4 U23.6 U23.7 | length 118.4
  TopLayer w0.25: C68.1@5.576,50.239 5.626,50.239 6.116,50.729 6.243,50.729 6.492,50.977 U7.6@7.117,50.977 ; v1(11.229,26.059) U3.9@11.229,26.963 ; R103.2@25.596,29.791 26.764,29.791 C141.1@26.788,29.815 ; C74.1@39.449,34.785 39.819,34.785 ccw(c39.819,34.947) v1(39.981,34.947) ; U10.5@43.495,9.979 43.52,9.954 43.67,9.954 43.67,9.804 44.699,8.776 v1(44.702,8.776) ; U10.8@43.495,11.179 43.495,11.449 43.548,11.501 v1(43.548,11.555) ; v1(48.228,20.592) 48.228,20.443 48.897,19.774 49.097,19.774 49.122,19.749 C135.1@49.112,19.749 ; C126.1@50.259,18.718 C128.1@50.858,18.718 ; C119.1@52.634,15.316 52.634,15.032 53.05,14.616 v1(53.776,14.616) ; v1@56.975,26.238 57.013,26.276 57.235,26.276 57.388,26.429 C101.1@57.398,26.429 58.07,26.429 58.274,26.225 58.274,25.609 C96.1@58.282,25.6 ; v1(56.994,26.219) 56.994,26.165 57.183,25.976 57.183,25.753 57.333,25.603 C104.1@57.383,25.603 57.386,25.6 C96.1@58.282,25.6 ; C96.1@58.285,25.598 C96.1@58.282,25.6 ; C113.1@60.802,11.999 60.802,12.715 60.952,12.865 C116.1@60.962,12.865
  TopLayer w0.3: C9.1@7.134,30.01 7.14,30.015 7.14,30.615 v1(7.145,30.621) ; C8.1@8.152,30.01 v1@8.152,30.574 ; v1(8.776,22.829) D12.2@8.776,23.689 ; C7.1@10.016,29.282 10.045,29.252 10.809,29.252 v1(10.828,29.233) ; v1(10.102,23.827) R7.1@10.102,24.439 ; U3.4@10.316,26.507 10.758,26.507 10.858,26.607 10.866,26.607 11.216,26.957 U3.9@11.216,27.257 ; R60.1@14.818,50.082 v1(14.818,50.879) ; R61.1@15.707,50.082 v1(15.707,50.879) ; v1(16.062,23.428) 16.047,23.444 16.047,24.102 R74.1@16.063,24.118 ; R62.1@16.596,50.082 v1(16.596,50.879) ; v1@17.184,23.344 R73.1@17.184,24.108 ; 18.267,23.335 R72.1@18.267,24.099 ; v1(22.17,29.109) 22.197,29.109 22.41,28.896 22.77,28.896 22.79,28.876 22.895,28.876 23.01,28.761 U8.6@23.01,27.779 ; v2(26.332,3.15) 26.423,3.059 26.423,1.423 P1.9@26.4,1.4 ; v1(26.969,14.592) R99.1@26.969,15.353 ; v1(27.194,15.957) C75.1@27.194,16.644 ; v2(32.502,3.472) 32.786,3.187 P1.17@32.786,1.4 ; v1(32.721,31.442) C84.1@33.407,31.442 ; v1(32.732,32.3) C79.1@33.418,32.3 ; v1(32.885,34.629) C87.1@33.571,34.629 ; v2(34.774,3.76) 34.971,3.76 35.253,3.478 cw(c34.981,3.353) 35.281,3.353 P1.23@35.281,1.407 ; C90.1@35.677,23.617 C179.1@36.492,23.617 ; v2(37.191,3.869) 37.191,3.832 37.693,3.33 P1.29@37.693,1.408 ; v2(39.569,3.868) 39.569,3.848 40.12,3.298 P1.35@40.12,1.415 ; C89.1@40.779,23.617 C88.1@41.492,23.617 C88.1@41.496,23.617 ; P1.41@42.488,1.422 42.488,3.479 v2(42.502,3.493) ; C78.1@43.616,31.444 v1(43.616,32.139) ; C76.1@43.658,33.532 v1(43.658,34.419) ; C80.1@43.832,25.723 C85.1@43.832,26.442 ; v1(52.375,35.536) C39.2@53.073,35.536 ; C98.1@53.978,11.994 C99.1@53.978,12.674 ; C106.1@54.42,26.421 54.43,26.421 54.7,26.151 54.744,26.151 v1(54.773,26.122) ; C108.1@54.754,25.603 54.763,25.613 54.763,26.113 v1(54.773,26.122) ; C45.1@54.833,35.536 v1(55.584,35.536) ; C102.1@55.119,26.429 55.109,26.429 54.802,26.122 v1(54.773,26.122) ; C147.1@57.909,11.745 C150.1@57.909,12.616 ; v1(59.269,33.989) R40.1@59.955,33.989 ; C109.1@59.821,38.01 v1(60.507,38.01) ; FB15.2@61.95,41.735 v1(62.636,41.735) ; C134.1@64.609,16.751 C131.1@65.489,16.751
  TopLayer w0.5: U14.6@22.048,14.309 22.048,16.034 U14.17@22.373,16.359 ; C100.1@55.557,14.012 55.557,14.062 55.582,14.087 55.632,14.087 C100.1@55.819,14.273 ; J3.1@65.865,34.77 v2@65.866,36.572 ; J1.3@67.34,49.821 v2(67.34,50.708) ; v2(67.34,51.708) J1.1@67.34,52.595 ; J2.3@67.34,54.073 v2(67.34,54.96) ; v2(67.34,55.96) J2.1@67.34,56.847 ; J3.3@68.815,34.77 v2(68.815,36.572)
  Bottom Layer w0.25: U9.1@22.514,13.481 22.514,13.57 22.629,13.685 22.997,13.685 v1(23.029,13.716) ; U6.39@35.217,26.942 35.008,26.942 34.699,27.252 34.699,27.296 34.846,27.296 34.992,27.442 U6.40@35.217,27.442 ; U6.47@35.217,30.942 U6.49@36.367,30.942 ; U6.2@36.367,31.967 U6.49@36.367,30.942 ; v1(37.236,38.198) C62.1@37.791,38.198 ; v1(38.318,34.419) ccw(c38.318,34.454) 38.353,34.454 C65.1@38.353,35.004 ; U6.8@39.367,31.93 U6.49@39.367,29.442 ; C66.1@39.757,38.196 39.759,38.198 40.263,38.198 v1(40.265,38.2) ; U6.11@40.88,31.96 40.88,30.955 v2(39.717,29.792) U6.49@39.367,29.442 ; U6.17@42.017,29.442 U6.49@39.367,29.442 ; C35.1@52.861,14.129 52.876,14.144 53.305,14.144 v1(53.776,14.616) ; 59.31,11.351 R38.2@59.31,12.189 ; U6.49@36.367,30.942 v2(36.417,30.892) v2(37.517,29.792) v2(38.617,28.692) U6.49@39.367,29.442
  Bottom Layer w0.3: R114.1@7.739,38.919 v1(7.739,39.484) ; U17.4@9.237,39.322 v1(9.237,39.886) ; v1(14.893,33.492) 14.897,33.495 C154.1@14.897,34.231 ; v1@17.06,36.137 R115.1@17.06,36.7 ; v2(24.59,6.444) 24.59,4.7 25.2,4.09 P1.6@25.2,1.4 ; P1.8@26,1.4 26,2.638 26.332,2.97 v2(26.332,3.15) 26.379,3.15 26.8,2.728 P1.10@26.8,1.4 ; v2(29.343,3.09) 29.357,3.076 P1.16@29.357,1.019 ; v2(34.658,4.871) 34.658,1.863 P1.22@34.724,1.796 ; P1.28@37.107,1.803 37.107,3.785 v2(37.191,3.869) ; v2(38.617,28.692) 39.367,27.942 U6.20@42.017,27.942 ; v2(39.569,3.868) 39.583,3.854 P1.34@39.583,1.796 ; U6.49@40.892,30.942 U6.14@42.017,30.942 ; P1.40@42,1.4 42,2.991 v2(42.502,3.493) ; v2(44.384,3.391) 44.427,3.349 P1.46@44.427,1.32 ; P1.52@46.8,1.4 46.8,2.25 47.433,2.883 47.481,2.883 48.006,3.408 v2(48.006,3.632) ; C37.1@55.918,25.622 55.918,25.627 56.038,25.747 C37.1@56.043,25.747
  other v1: 34.214,7.285 39.552,8.45 64.175,10.463 62.361,10.73 26.668,10.926 64.175,11.63 26.716,11.995 64.175,12.714 37.107,13.066 61.847,15.259 68.815,15.523 35.469,18.301 17.12,23.317 65.422,25.123 33.088,26.474 8.153,30.574 56.728,31.253 28.272,31.98 56.728,33.784 17.034,36.218
  other v2: 29.302,4.666 65.581,6.742 21.823,15.809 22.923,15.809 56.343,16.606 57.693,16.606 59.043,16.606 21.823,16.909 22.923,16.909 55.093,17.856 56.343,17.856 57.693,17.856 59.043,17.856 60.293,17.856 55.093,19.206 56.343,19.206 57.693,19.206 59.043,19.206 60.293,19.206 55.093,20.556 56.343,20.556 57.693,20.556 59.043,20.556 60.293,20.556 56.343,21.806 57.693,21.806 59.043,21.806 36.417,26.492 37.517,26.492 38.617,26.492 39.717,26.492 40.817,26.492 36.417,27.592 37.517,27.592 38.617,27.592 39.717,27.592 40.817,27.592 36.417,28.692 37.517,28.692 39.717,28.692 40.817,28.692 36.417,29.792 38.617,29.792 40.817,29.792 37.517,30.892 38.617,30.892 39.717,30.892 40.817,30.892 65.866,36.572
  other v3: 22.54,23.159 23.675,23.159 24.945,23.159 26.08,23.159 22.54,24.294 23.675,24.294 24.945,24.294 26.08,24.294 22.54,25.564 23.675,25.564 24.945,25.564 26.08,25.564 22.54,26.699 23.675,26.699 24.945,26.699 26.08,26.699 8.197,50.507 9.332,50.507 10.602,50.507 11.737,50.507 8.197,51.642 9.332,51.642 10.602,51.642 11.737,51.642 8.197,52.912 9.332,52.912 10.602,52.912 11.737,52.912 8.197,54.047 9.332,54.047 10.602,54.047 11.737,54.047